# Altium PCB OmniCore_SDR.PcbDoc (part 4 of 14)
Units mil, origin at the board's own origin, x right, y up, seen from the top; angles counter-clockwise.
Board outline 4724.72 x 2755.91 mil, 8 copper layers (Top, GND 1, Layer 1, Layer 2, GND 2, Layer 3, Power, Bottom), stack 40.468 mil thick; 534 components, 427 nets, 2325 pads, 1892 vias.
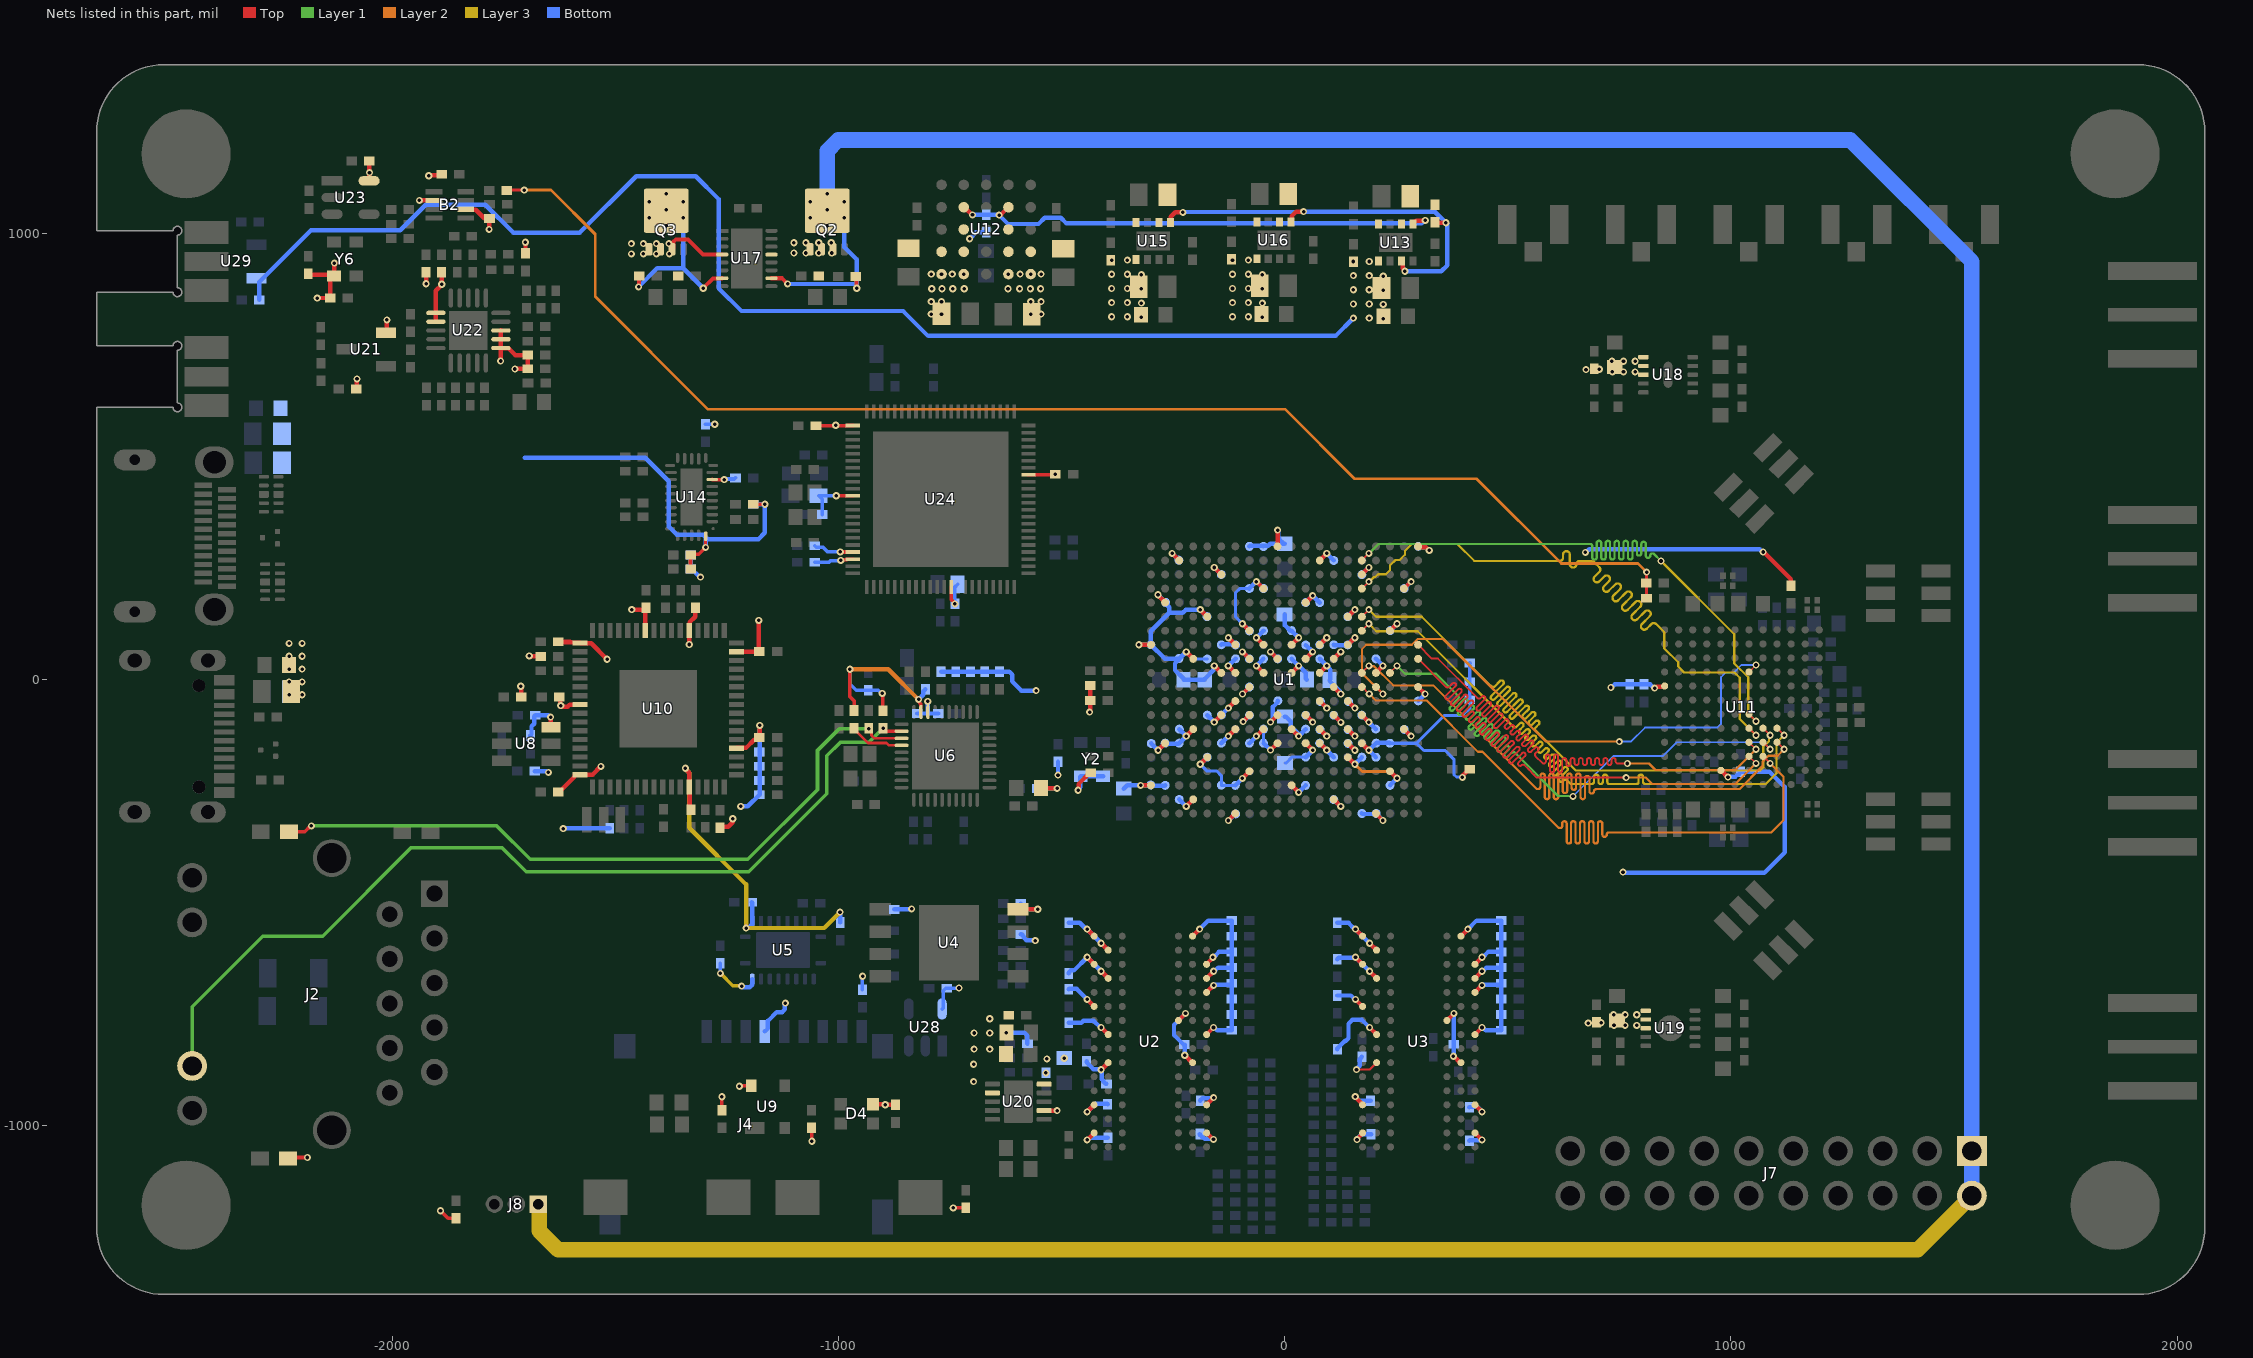
[diagram p9: the nets of this part, all layers, seen from the top]

## Via types
v1: diameter 16, hole 8, Top to Bottom, tented both sides, 1844 vias
v2: diameter 19.68, hole 7.87, Top to Bottom, 44 vias
v3: diameter 200, hole 125, Top to Bottom, 4 vias

## Nets (pads, with @x,y where several pads share a name; then routed paths per layer and width w, separated by ;. In a path a pad name is that pad's centre, name@x,y a point inside that pad or via, vN(x,y) a via of type N, cw(c..) or ccw(c..) an arc to the next point about the centre after c; other vN are vias at no path point)
1V0: C8.2 C9.2 C10.2 C11.2 C12.2 C13.2 C14.2 C15.2 C40.2 C41.2 C172.2 C173.2 C238.2 C241.1 C263.2 C264.2 C265.2 C266.2 C267.2 C268.2 C303.2 C307.2 U1.G7 U1.G11 U1.G13 U1.H10 U1.H12 U1.J7 U1.J13 U1.K12 U1.L7 U1.L13 U1.M12 U1.N7 U1.N13 U1.P8 U1.P12 U1.R7 U1.R13 U12.A1 U12.B1 U12.D1 U12.E1 | length 901.7
  Top w10: v1(-126.39,30.71) -126.31,30.71 -110.56,14.96 U1.G11@-110.48,14.96 ; v1(-126.23,-126.77) U1.G7@-110.48,-111.02 ; v1(-126.23,93.7) U1.G13@-110.48,77.95 ; v1(-94.73,62.2) U1.H12@-78.98,46.46 ; v1(-94.6,-32.28) -94.6,-32.22 -78.98,-16.6 U1.H10@-78.98,-16.54 ; v1(-63.24,-126.77) U1.J7@-47.49,-111.02 ; v1(-63.24,93.7) U1.J13@-47.49,77.95 ; v1(-31.74,62.2) U1.K12@-15.99,46.46 ; U1.L7@15.5,-111.02 v1(31.25,-126.77) ; U1.L13@15.5,77.95 v1(31.25,93.7) ; U1.M12@47,46.46 v1(62.75,62.2) ; U1.N7@78.5,-111.02 v1(94.24,-126.77) ; U1.N13@78.5,77.95 v1(94.24,93.7) ; U1.P8@109.99,-79.53 109.99,-79.66 126.1,-95.77 v1(126.1,-95.9) v1@126.23,-95.9 ; U1.P12@109.99,46.46 v1(125.74,62.2) ; U1.R7@141.36,-111.02 U1.R7@141.49,-111.02 v1(157.24,-126.77) ; U1.R13@141.49,77.95 v1(157.24,93.7)
  Bottom w10: C14.2@-142,77.9 -140.7,79.2 C173.2@-111.72,79.2 ; C41.2@-141.9,-142.4 v1(-126.23,-126.77) ; v1(-126.39,30.71) -126.14,30.71 -110.25,46.6 C266.2@-110,46.6 ; v1(-126.23,93.7) C173.2@-111.72,79.2 ; C173.2@-110.2,77.7 C173.2@-111.7,79.2 ; v1(-94.73,62.2) -94.73,62.07 -79.4,46.74 C40.2@-79.4,46.6 ; v1@-94.6,-32.24 C267.2@-79,-16.6 ; C268.2@-79,-142.5 v1@-63.25,-126.77 ; v1(-63.24,93.7) -63.12,93.7 -47.52,109.3 C9.2@-47.4,109.3 ; v1(-31.74,62.2) -31.57,62.2 -15.77,46.4 C8.2@-15.6,46.4 ; C303.2@-0.1,146.24 -0.1,121.3 0,121.2 1.19,121.2 12.77,109.63 15.4,109.63 31.25,93.77 v1(31.25,93.7) ; C307.2@0.4,-82.94 2.37,-82.94 13.12,-93.69 13.12,-104.58 30.1,-121.57 30.1,-125.62 v1(31.25,-126.77) ; v1@31.25,-126.71 47,-110.96 C263.2@47,-110.9 ; C11.2@47.3,77.4 47.43,77.4 62.62,62.2 v1(62.75,62.2) ; C10.2@78.5,77.9 v1(94.24,93.7) ; C264.2@79.1,-112 79.29,-112 94.06,-126.77 v1(94.24,-126.77) ; C13.2@110,78 111.3,76.7 140.3,76.7 C12.2@141.3,77.7 ; C15.2@110.15,-80 v1(126.1,-95.9) ; C12.2@141.3,77.7 v1(157.24,93.7) ; C265.2@142.1,-112 142.28,-112 157.05,-126.77 v1(157.24,-126.77)
  other v1: -792,819 -769,819 -569,819 -546,819 -792,847 -769,847 -569,847 -546,847 -791,876 -768,876 -744,876 -718,876 -620,876 -594,876 -570,876 -547,876 -792,908.69 -769,908.69 -745,908.69 -719,908.69 -619,908.69 -593,908.69 -569,908.69 -546,908.69
1V0_PG: R120.1 U12.B4 U12.D4 U13.1 | length 1123.7
  Top w10: U12.B4@-719,1058.69 -717.92,1058.69 -700.71,1041.47 v1(-699.63,1041.47) ; v1(-640,1041) -638.85,1042.15 -635.54,1042.15 U12.D4@-619,1058.69 ; U13.1@287.39,1020.71 287.39,1022.68 290.26,1025.55 292.23,1025.55 294.53,1027.85 314.01,1027.85 v1(315.16,1029)
  Bottom w10: v1(-699.63,1041.47) -699.58,1041.42 -669.05,1041.42 R120.1@-669,1041.37 -668.82,1041.19 -640.18,1041.19 v1(-640,1041) -620,1021 -551.69,1021 -537.69,1035 -502,1035 -490,1023 307.53,1023 313.53,1029 v1(315.16,1029)
1V8: C24.2 C25.2 C26.2 C27.2 C28.2 C29.2 C30.2 C31.2 C46.2 C47.2 C59.2 C60.2 C64.2 C65.2 C66.2 C67.2 C68.2 C69.2 C72.2 C73.2 C132.1 C136.2 C137.2 C138.2 C176.2 C180.2 C187.2 C189.2 C190.2 C191.2 C204.2 C205.2 C234.2 C248.2 C253.2 C254.2 C258.2 C259.2 C269.2 C270.2 C271.2 C272.2 C301.2 C306.2 C309.2 L1.2 L2.2 R5.1 R6.1 R64.1 R65.1 R66.1 R67.1 R69.2 R119.2 R122.2 R146.1 U1.A13 U1.B16 U1.D12 U1.E15 U1.F8 U1.F11 U1.G9 U1.H8 U1.J11 U1.K8 U1.L11 U1.M8 U1.N9 U1.N11 U1.N19 U1.P10 U1.R9 U1.R15 U1.T8 U1.T18 U1.U11 U1.V14 U1.W7 U1.W17 U1.Y10 U1.Y20 U5.2 U6.28 U10.12 U10.37 U10.49 U10.64 U11.B8 U11.H12 U13.4 U13.5 U18.1 U18.2 U18.3 U19.1 U19.2 U19.3 U29.3 | length 7610.5
  Top w4.2: v1(-800,-49) -799.7,-49.3 -799.7,-72.3 U6.28@-799.4,-72.6
  Top w10: C189.2@-1627.65,-252 -1625.69,-252 -1590.46,-216.78 -1590.46,-214.02 -1589.56,-213.11 U10.64@-1578.73,-213.11 -1551.11,-213.11 v1(-1532.4,-194.4) ; v1(-1518.6,45.6) -1554.26,81.26 -1577.83,81.26 U10.49@-1578.73,82.17 -1579.64,83.07 -1598.91,83.07 ; v1(-1343.1,-198.7) -1343.1,-200.32 -1334.64,-208.79 U10.12@-1334.64,-240.67 ; v1(-1334.38,78.56) -1334.38,109.47 U10.37@-1334.64,109.72 -1333.73,110.63 -1333.73,128.27 -1321,141 -1321,160.65 C191.2@-1320.34,161.31 ; U10.12@-1333.73,-242.48 -1333.73,-287.92 C190.2@-1330.34,-291.31 ; v1(-437,-73) -436.18,-72.18 -436.18,-47.81 R5.1@-435.37,-47 R6.1@-435.37,-13 ; v1(-326.63,77.98) U1.A13@-299.46,77.95 ; v1(-283.94,190) -283.94,189.21 -267.96,173.23 U1.B16@-267.96,172.44 ; v1(-220.72,62.2) U1.D12@-204.97,46.46 ; v1(-189.22,156.69) U1.E15@-173.47,140.94 ; v1(-157.72,-95.28) U1.F8@-141.98,-79.53 ; v1(-157.72,30.71) U1.F11@-141.98,14.96 ; v1(-126.23,-63.78) U1.G9@-110.48,-48.03 ; v1(-93.18,-94.28) -93.18,-94 -78.98,-79.81 U1.H8@-78.98,-79.53 ; v1(-63.24,30.71) U1.J11@-47.49,14.96 ; v1(-31.74,-95.28) U1.K8@-15.99,-79.53 ; U1.L11@15.5,14.96 v1(31.25,30.71) ; U1.M8@47,-79.53 v1(62.75,-95.28) ; U1.N9@78.5,-48.03 v1(94.24,-63.78) ; U1.N11@78.5,14.96 v1(94.24,30.71) ; U1.N19@78.5,266.93 v1(94.24,282.68) ; U1.P10@109.99,-16.54 v1(125.74,-32.28) ; U1.R9@141.49,-48.03 v1(157.24,-63.78) ; U1.R15@141.49,140.94 v1(157.24,156.69) ; U1.T8@172.98,-79.53 v1(188.73,-95.28) ; U1.T18@172.98,235.43 v1(188.73,251.18) ; U1.U11@204.48,14.96 v1(220.23,30.71) ; U1.V14@235.98,109.45 v1(251.72,125.2) ; U1.W7@267.47,-111.02 v1(283.22,-126.77) ; U1.W17@267.47,203.94 v1(283.22,219.68) ; U1.Y10@298.97,-16.54 v1(314.72,-32.28) ; U1.Y20@298.97,298.43 300.44,296.95 315.93,296.95 323.38,289.5 v1(324,289.5) ; v1(829,-19) 830.62,-19 833.91,-15.72 850.34,-15.72 U11.H12@851.51,-14.54 ; U11.B8@977.5,-203.52 977.98,-203.52 993.01,-218.54 v1(993.5,-218.54) ; v1(1072.25,285.86) 1073.5,285.86 1134.5,224.86 1134.5,210.19 R119.2@1134.4,210.09 ; -1598.91,83.07 -1600.84,85 C187.2@-1627.65,85 -1625.72,83.07 -1598.91,83.07
  Layer 3 w10: v1(-1343.1,-198.7) -1343.1,-200.32 -1334.4,-209.02 -1334.4,-331.74 -1207,-459.14 v1(-1207,-557) -1206.69,-556.69 -1031.98,-556.69 v1(-996.46,-521.17)
  Bottom w7: v1(-220.72,62.2) -204.72,46.21 C176.2@-173.42,46.21
  Bottom w8: R146.1@-2298.02,850.8 R146.1@-2297.81,850.59
  Bottom w10: R146.1@-2298.02,850.8 -2298.02,891.03 -2182.04,1007 -1981.96,1007 -1924.86,1064.1 -1791.4,1064.1 -1728.4,1001.1 -1580.2,1001.1 -1453.3,1128 -1319.6,1128 -1268.6,1077 -1268.6,877.3 -1217.3,826 -855.15,826 -799.25,770.1 114.1,770.1 v1(154,810) ; v1(-1207,-557) -1205.85,-555.85 -1201.35,-555.85 U5.2@-1193.39,-547.89 ; C132.1@-1194.53,-499.04 -1193.11,-500.46 U5.2@-1193.11,-547.61 ; v1(-996.46,-521.17) -996.34,-521.29 -996.34,-544.23 R69.2@-996.21,-544.35 ; C136.2@-823,-76 -799.5,-76 ; v1(-800,-49) -799.5,-49.5 -799.5,-76 ; C137.2@-776,-76 -799.5,-76 ; R64.1@-770,17.68 R65.1@-737,17.68 R66.1@-704,17.68 R67.1@-672,17.68 C138.2@-639,17.69 -616.86,17.69 -610.51,11.34 -610.51,-4.22 -590.13,-24.6 v1(-557.1,-24.6) ; v1(-326.63,77.98) C270.2@-299.9,78 ; v1(-283.94,190) C269.2@-266.9,173 -266.9,170.29 -259,162.39 -259,149.5 ; C271.2@-237.88,47.1 -269,47.1 C270.2@-299.9,78 ; C271.2@-236.41,45.63 -245.8,36.24 -245.8,20.93 -226.44,1.57 C309.2@-226.44,-0.4 -179.26,-0.4 L1.2@-179.16,-0.5 -179.16,1.47 -158.87,21.76 -158.87,29.56 v1(-157.72,30.71) ; C271.2@-236.41,46.51 v1(-220.72,62.2) ; C272.2@-174,141.1 -174,141.29 -189.22,156.51 v1(-189.22,156.69) -221.33,156.69 -228.52,149.5 -259,149.5 ; C47.2@-173.4,-79.6 v1(-157.72,-95.28) ; C180.2@-141.9,-79.6 -141.9,-79.53 -126.23,-63.85 v1(-126.23,-63.78) ; v1(-93.18,-94.28) -93.18,-94.18 -79,-80 C28.2@-79,-79.9 ; v1(-63.24,30.71) C25.2@-47.5,46.4 ; v1(-31.74,-95.28) -31.74,-93.65 -26.32,-88.23 -26.32,-61.22 -15.2,-50.11 C27.2@-15.2,-47.4 ; C24.2@15.4,46.4 15.48,46.4 31.17,30.71 v1(31.25,30.71) 32.29,30.71 47.4,15.6 47.4,2.16 L2.2@49.56,0 ; C46.2@47.1,-80 47.29,-80 62.56,-95.28 v1(62.75,-95.28) ; C26.2@78.6,46.4 v1(94.24,30.71) ; C30.2@79.9,-49 79.9,-49.22 94.24,-63.56 v1(94.24,-63.78) ; v1(94.24,30.71) 94.24,30.46 102.3,22.4 102.3,0.86 C306.2@100.44,-1 100.44,-2.97 124.59,-27.12 124.59,-31.14 v1(125.74,-32.28) ; v1(94.24,282.68) 94.33,282.68 110.01,267 C59.2@110.1,267 ; C72.2@141.4,140.9 v1(157.24,156.69) ; C31.2@142.9,-49 142.9,-49.22 157.24,-63.56 v1(157.24,-63.78) ; C29.2@172.7,-79.6 172.88,-79.6 188.55,-95.28 v1(188.73,-95.28) 188.73,-95.45 204,-110.72 C65.2@204,-110.9 ; C69.2@173,235.1 173,235.28 188.73,251.01 v1(188.73,251.18) ; C68.2@204.5,46.5 v1(220.23,30.71) ; C67.2@236.3,109.7 v1(251.72,125.2) ; C64.2@267.9,-111.6 267.97,-111.6 283.15,-126.77 v1(283.22,-126.77) ; C73.2@268,204.1 268,204.28 283.22,219.5 v1(283.22,219.68) ; C66.2@299.2,-47.8 v1(314.72,-32.28) ; C60.2@299.3,298.5 301.21,296.59 315.29,296.59 322.38,289.5 v1(324,289.5) ; v1(673.9,284.9) 675.45,284.9 682.76,292.21 1064.28,292.21 1070.62,285.86 v1(1072.25,285.86) ; v1(731,-17.7) 732.62,-17.7 739.47,-10.86 C205.2@773.5,-10.86 C301.2@805.5,-10.86 819.23,-10.86 827.38,-19 v1(829,-19) ; v1(758.16,-431.34) 759.82,-433 1075.2,-433 1120.75,-387.45 1120.75,-240.55 1086.43,-206.23 C204.2@1021.5,-206.23 1021.5,-208.2 1016.65,-213.04 1014.69,-213.04 1010.33,-217.4 994.64,-217.4 v1(993.5,-218.54) ; C270.2@-299.9,78 -299.91,108.59 -259,149.5
  other v1: 738,-775 763,-775 789,-775 680.3,-769.7 709,-769 737,-751 763,-751 789,-751 734.3,689.5 759.3,689.5 785.3,689.5 675.3,694.5 705.3,695.5 733.3,713.5 759.3,713.5 785.3,713.5 221,809 189.56,810 221,840.75 154,841.75 189.56,841.75 221,872.5 189.56,873.5 154,873.5 221,904.25 154,905.25 189.56,905.25 154,937 189.56,937
1V8_PG: R121.1 U13.7 U15.1 U16.1 | length 937.2
  Top w10: U15.1@-256.17,1024.02 -255,1025.2 -255,1037 -245,1047 v1(-228,1047) ; U16.1@14.39,1025.71 15.56,1026.88 15.56,1038.69 25.56,1048.69 v1(42.56,1048.69) ; U13.7@261.8,938.03 264.67,935.16 264.67,921.39 269.34,916.71 v1(269.34,915.09) ; R121.1@337,1024.69 337.46,1024.22 360.91,1024.22 v1(361.37,1023.76)
  Bottom w10: v1(-228,1047) -227.16,1047.84 41.72,1047.84 v1(42.56,1048.69) 336.45,1048.69 v1(361.37,1023.76) 364,1021.13 364,928.18 350.91,915.09 v1(269.34,915.09)
1V35: C16.2 C17.2 C18.2 C19.2 C20.2 C21.2 C22.2 C23.2 C44.2 C45.2 C76.2 C77.2 C78.2 C79.2 C80.2 C81.2 C82.2 C83.2 C84.2 C85.2 C86.2 C87.2 C88.2 C89.2 C90.2 C91.2 C92.2 C93.2 C94.2 C95.2 C96.2 C97.2 C98.2 C99.2 C100.2 C101.2 C102.2 C103.2 C104.2 C105.2 C106.2 C107.2 C108.2 C109.2 C110.2 C111.2 C123.2 C124.2 C167.1 C168.1 C174.2 C175.2 C293.2 C294.2 C305.2 R28.1 R30.2 R128.2 U1.A3 U1.D2 U1.E5 U1.G1 U1.H4 U1.L3 U1.P2 U1.R5 U1.U1 U1.V4 U2.A1 U2.A8 U2.B2 U2.C1 U2.C9 U2.D2 U2.D9 U2.E9 U2.F1 U2.G7 U2.H2 U2.H9 U2.K2 U2.K8 U2.N1 U2.N9 U2.R1 U2.R9 U3.A1 U3.A8 U3.B2 U3.C1 U3.C9 U3.D2 U3.D9 U3.E9 U3.F1 U3.G7 U3.H2 U3.H9 U3.K2 U3.K8 U3.N1 U3.N9 U3.R1 U3.R9 U16.4 U16.5 U20.2 | length 4002.9
  Top w5: v1(161,-874) 190.48,-874 U3.K2@206.02,-858.46
  Top w10: v1(-442.72,-1031.69) U2.R1@-426.98,-1015.94 ; v1(-442.72,-968.7) U2.N1@-426.98,-952.95 ; v1(-442.72,-716.73) U2.F1@-426.98,-732.48 ; v1(-442.72,-622.24) U2.C1@-426.98,-637.99 ; v1(-442.72,-559.25) U2.A1@-426.98,-575 ; v1(-411.23,-874.21) U2.K2@-395.48,-858.46 ; v1(-411.23,-779.72) U2.H2@-395.48,-795.47 ; v1(-411.23,-653.74) U2.D2@-395.48,-669.49 ; v1(-411.23,-590.75) U2.B2@-395.48,-606.49 ; v1(-323,-237) U1.A3@-299.46,-237.01 ; U2.G7@-238,-763.97 v1(-222.25,-748.23) ; v1(-224,-842) -223.48,-842 -207.02,-858.46 U2.K8@-206.5,-858.46 ; v1(-220.5,-284.25) -220.5,-284.14 -204.97,-268.61 U1.D2@-204.97,-268.5 ; U2.A8@-206.5,-575 v1(-190.76,-559.25) ; v1(-189.22,-189.76) U1.E5@-173.47,-174.02 ; U2.R9@-175.01,-1015.94 -174.53,-1015.94 -159.98,-1030.5 v1(-159.5,-1030.5) ; U2.N9@-175.01,-952.95 -175.01,-952.74 -159.41,-937.14 v1(-159.41,-936.93) ; U2.H9@-175.01,-795.47 -175.01,-795.35 -159.5,-779.84 v1(-159.5,-779.72) ; U2.E9@-175.01,-700.98 v1(-159.26,-685.23) ; U2.D9@-175.01,-669.49 v1(-159.26,-653.74) ; U2.C9@-175.01,-637.99 -175.01,-637.2 -160.85,-623.04 v1(-160.85,-622.24) ; v1(-126.23,-315.75) U1.G1@-110.48,-300 ; v1(-94.73,-221.5) -94.73,-221.38 -78.98,-205.63 U1.H4@-78.98,-205.51 ; U1.L3@15.5,-237.01 v1(31.25,-252.76) ; U1.P2@109.99,-268.5 v1(125.74,-284.25) ; U1.R5@141.49,-174.02 v1(157.24,-189.76) ; v1(158.1,-934.5) 158.1,-935.51 174.52,-951.94 U3.N1@174.52,-952.95 ; v1(158.77,-716.73) U3.F1@174.52,-732.48 ; v1(158.77,-622.24) U3.C1@174.52,-637.99 ; v1(158.77,-559.25) U3.A1@174.52,-575 ; v1(162,-1031) 162,-1029.73 174.52,-1017.21 U3.R1@174.52,-1015.94 ; v1(190.27,-779.72) U3.H2@206.02,-795.47 ; v1(190.27,-653.74) U3.D2@206.02,-669.49 ; v1(190.27,-590.75) U3.B2@206.02,-606.49 ; U1.U1@204.48,-300 v1(220.23,-315.75) ; U1.V4@235.98,-205.51 v1(251.72,-221.26) ; U3.G7@363.5,-763.97 v1(379.25,-748.23) ; v1(378,-844) 379.27,-844 393.73,-858.46 U3.K8@394.99,-858.46 ; U3.A8@394.99,-575 v1(410.74,-559.25) ; U3.R9@426.49,-1015.94 v1(442.24,-1031.69) ; U3.N9@426.49,-952.95 v1(442.24,-968.7) ; U3.H9@426.49,-795.47 v1(442.24,-779.72) ; U3.E9@426.49,-700.98 v1(442.24,-685.23) ; U3.D9@426.49,-669.49 v1(442.24,-653.74) ; U3.C9@426.49,-637.99 v1(442.24,-622.24)
  Layer 2 w7: v1(157.24,-189.76) 173.19,-205.71 236.18,-205.71 v1(251.72,-221.26)
  Bottom w7: v1(-189.22,-189.76) -173.72,-205.26 -151.8,-205.26 -141.9,-215.16 C23.2@-141.9,-236.8 -141.75,-236.95 -110.55,-236.95 R28.1@-110.4,-237.1
  Bottom w10: v1(-623.56,-791) -583.5,-791 -576.8,-797.7 -576.8,-815.51 R30.2@-576.31,-816 ; C87.2@-484,-769.31 -455.52,-769.31 -451.21,-765 -427.57,-765 -412.85,-779.72 v1(-411.23,-779.72) ; C88.2@-484,-694.31 -482.68,-693 -466.45,-693 v1(-442.72,-716.73) ; C85.2@-484,-658.69 -484,-656.72 -479.16,-651.87 -472.36,-651.87 v1(-442.72,-622.24) v1(-411.23,-653.74) ; C96.2@-484,-544.63 -458.97,-544.63 -444.35,-559.25 v1(-442.72,-559.25) v1(-411.23,-590.75) ; C123.2@-444,-855.69 -444,-857.65 -428.59,-873.06 -412.38,-873.06 v1(-411.23,-874.21) -410.08,-875.36 -410.08,-895.23 -406.13,-899.19 -406.13,-901.16 -401.28,-906 C92.2@-399.31,-906 ; v1(-442.72,-1031.69) -441.1,-1031.69 -435.73,-1026.31 C80.2@-396,-1026.31 ; v1(-442.72,-968.7) -425.03,-951 -397.31,-951 C86.2@-397,-951.31 ; C305.2@-360.6,-244.54 -353.06,-237 v1(-323,-237) -322.55,-236.55 -300.45,-236.55 C174.2@-300,-236.1 -298.09,-238.01 -291.01,-238.01 -290.75,-238.27 -268.97,-238.27 C44.2@-267.8,-237.1 ; C175.2@-236.4,-268.6 -236.28,-268.6 -220.62,-284.25 v1(-220.5,-284.25) ; v1(-224,-842) -224.34,-841.66 -224.34,-818.34 C82.2@-224.69,-818 -226.65,-818 -248,-796.65 -248,-773.97 v1(-222.25,-748.23) ; v1(-190.76,-559.25) -171.51,-540 C91.2@-118.69,-540 C90.2@-118.69,-575.14 C93.2@-118.69,-610.29 ; C81.2@-190,-1018.31 -190,-1020.28 -185.16,-1025.13 -183.19,-1025.13 -178.96,-1029.35 -160.65,-1029.35 v1(-159.5,-1030.5) ; v1(-189.22,-189.76) -189.22,-189.64 -173.6,-174.02 C17.2@-173.6,-173.9 ; C79.2@-189,-944.31 -189,-942.49 -184.16,-937.65 -184.16,-938.08 -160.56,-938.08 v1(-159.41,-936.93) ; v1(-160.85,-622.24) -159.22,-622.24 -147.27,-610.29 C93.2@-118.69,-610.29 ; v1(-159.5,-779.72) -157.88,-779.72 -151.6,-786 C83.2@-118.69,-786 C84.2@-118.69,-750.86 C89.2@-118.69,-715.71 C94.2@-118.69,-680.57 ; v1(-159.26,-685.23) -158.11,-684.09 -122.2,-684.09 C94.2@-118.69,-680.57 ; v1(-159.26,-653.74) -157.64,-653.74 -149.33,-645.43 C95.2@-118.69,-645.43 ; v1(-126.23,-315.75) -125.44,-315.75 -110.69,-301 C16.2@-109.9,-301 ; R28.1@-110.4,-237.1 v1@-94.77,-221.5 ; v1(31.25,-252.76) 31.25,-252.7 46.8,-237.15 C18.2@46.8,-237.1 ; C22.2@110.1,-269 110.29,-269 125.55,-284.25 v1(125.74,-284.25) ; C102.2@118,-707.98 148.4,-707.98 157.15,-716.73 v1(158.77,-716.73) ; C104.2@118,-626.65 121.26,-623.39 157.63,-623.39 v1(158.77,-622.24) v1(190.27,-653.74) ; C101.2@118,-545.32 143.22,-545.32 157.15,-559.25 v1(158.77,-559.25) v1(190.27,-590.75) ; C103.2@118.09,-828.69 118.09,-826.72 134.09,-810.72 135.93,-810.72 143,-803.65 143,-771.45 151.73,-762.72 173.27,-762.72 v1(190.27,-779.72) ; v1@157.24,-189.71 C20.2@173.1,-173.85 ; v1(158.1,-934.5) 167.91,-944.31 C76.2@192.5,-944.31 ; v1(161,-874) 161,-872.38 168.16,-865.22 168.16,-850.53 C124.2@173,-845.69 ; v1(162,-1031) 163.15,-1029.85 163.15,-1027.32 171.15,-1019.31 C77.2@193.5,-1019.31 ; C45.2@173.1,-300 174.35,-301.25 206.04,-301.25 220.23,-315.44 v1(220.23,-315.75) ; C19.2@236.1,-237 236.1,-236.94 v1(251.72,-221.26) v1(251.72,-221.26) ; v1(378,-844) 378.66,-843.34 378.66,-748.81 v1(379.25,-748.23) ; v1(410.74,-559.25) 429.99,-540 C106.2@485.31,-540 C105.2@485.31,-575.14 C108.2@485.31,-610.29 ; C111.2@414,-1033.31 414.81,-1032.5 441.43,-1032.5 v1(442.24,-1031.69) ; C110.2@414,-958.31 414.49,-957.82 432.98,-957.82 442.24,-967.07 v1(442.24,-968.7) ; v1(442.24,-779.72) 443.86,-779.72 450.14,-786 C107.2@485.31,-786 C97.2@485.31,-750.86 C98.2@485.31,-715.71 C99.2@485.31,-680.57 ; v1(442.24,-685.23) 443.39,-684.09 481.8,-684.09 C99.2@485.31,-680.57 ; v1(442.24,-653.74) 443.86,-653.74 452.17,-645.43 C100.2@485.31,-645.43 ; v1(442.24,-622.24) 443.86,-622.24 455.82,-610.29 C108.2@485.31,-610.29 ; C94.2@-118.69,-680.57 C95.2@-118.69,-645.43 ; C95.2@-118.69,-645.43 C93.2@-118.69,-610.29 ; C99.2@485.31,-680.57 C100.2@485.31,-645.43 ; C100.2@485.31,-645.43 C108.2@485.31,-610.29
  other v1: -697,-901 -697,-862 -696,-828 -661,-828 -696,-792 -661,-792 -661,-760 -50,812 -117,813 -81.44,813 -50,843.75 -117,844.75 -81.44,844.75 -117,876.5 -81.44,876.5 -50,875.5 -50,907.25 -117,908.25 -81.44,908.25 -117,940 -81.44,940
3V3: B2.2 B2.6 C1.1 C2.2 C5.1 C32.2 C33.2 C34.2 C35.2 C42.2 C43.2 C48.2 C49.2 C50.2 C51.2 C52.2 C53.2 C54.2 C55.2 C56.2 C57.2 C70.2 C71.2 C112.1 C113.1 C126.1 C129.1 C130.1 C133.1 C143.2 C144.2 C145.2 C154.2 C155.2 C163.2 C170.2 C179.2 C181.2 C182.2 C183.2 C184.2 C185.2 C188.2 C192.2 C193.2 C194.2 C195.2 C198.2 C247.2 C262.1 C273.1 C281.2 C282.2 C283.2 C284.2 C287.1 C288.1 C289.1 C292.2 C295.2 C304.2 C308.2 D4.4 J4.4 L4.1 R1.1 R4.1 R9.2 R13.1 R14.1 R18.2 R19.2 R21.2 R22.2 R29.2 R63.2 R72.1 R74.1 R77.1 R78.1 R81.2 R89.1 R90.2 R95.2 R96.2 R97.2 R98.2 R101.1 R102.2 R103.2 R104.2 R107.2 R108.1 R113.2 R127.2 U1.B6 U1.C19 U1.D7 U1.F18 U1.H14 U1.J17 U1.K6 U1.K20 U1.M6 U1.M16 U1.N6 U1.R6 U1.T6 U4.8 U5.19 U6.29 U8.6 U9.4 U10.20 U10.31 U10.42 U10.56 U14.8 U15.4 U15.5 U20.7 U20.10 U21.3 U22.6 U22.7 U22.16 U22.17 U22.18 U23.5 U24.1 U24.11 U24.19 U24.20 U24.35 U24.59 U28.5 Y2.1 Y2.4 Y6.4 | length 5434.2
  Top w8: v1(-1891.84,-1190.4) -1874.85,-1207.38 R14.1@-1856.9,-1207.38 ; U14.8@-1282.72,448.37 -1282.53,448.18 -1256.18,448.18 v1(-1256,448) ; v1(-1261.3,-935) -1261.2,-935.1 -1261.2,-964.91 C113.1@-1261.1,-965.01 ; v1(-1221.87,-911.45) -1220.88,-910.46 U9.4@-1195.5,-910.46 ; R4.1@-1060.1,-1004.39 -1059.75,-1004.74 -1059.75,-1034.25 v1(-1059.4,-1034.6) ; C163.2@-1050.31,569 -980,569 -979.6,569.4 U24.1@-967.9,569.4 ; v1(-1005,412) v1(-1005,412) -967.95,411.95 U24.11@-967.9,411.9 ; v1(-996,286) v1(-996,286) -967.95,285.95 U24.19@-967.9,285.9 ; v1(-995,267) -993.47,268.53 -981.17,268.53 -979.6,270.1 U24.20@-967.9,270.1 ; v1(-974.5,23.2) -974.5,-38.1 -965,-47.6 R72.1@-965,-69.32 ; v1(-901.79,-30.81) -900.89,-31.71 -900.89,-68.74 R89.1@-900,-69.63 ; v1(-820.47,-44.47) -818.94,-46 -818.94,-51.23 -815.16,-55 U6.29@-815.16,-60.85 ; U24.35@-747.4,207.2 -747.4,179.45 -739,171.05 v1(-739,169.69) ; v1(-742.82,-1183.84) -742.67,-1183.68 R13.1@-714.7,-1183.68 ; U24.59@-574.2,459.1 -574.15,459.15 -514.54,459.15 v1(-513.68,460) ; L4.1@-546.44,-243 L4.1@-545.44,-244
  Top w10: R74.1@-2233.5,-1073 -2231.5,-1071 v1(-2190,-1071) ; C262.1@-2188.35,909.35 -2185.95,906.95 -2132.75,906.95 Y6.4@-2130.35,904.55 ; v1(-2168,855) -2167.83,855.17 -2139.52,855.17 C273.1@-2139.35,855.35 -2139.35,897.15 -2131.95,904.55 Y6.4@-2130.35,904.55 ; v1(-2129.73,933.4) -2130.35,932.78 Y6.4@-2130.35,904.55 ; R108.1@-2080.66,651.35 -2079.83,652.18 -2079.83,673.17 v1(-2079,674) ; U23.5@-2051.99,1117.75 -2051.99,1135.01 v1(-2051,1136) -2051.33,1136.33 -2051.33,1162.02 C289.1@-2051.66,1162.35 ; U21.3@-2013.84,777.34 -2012,779.18 v1(-2012,806) ; v1(-1939,1074) -1938.86,1073.86 -1906.35,1073.86 B2.2@-1906.21,1073.72 ; C283.2@-1924.35,912.66 -1924.17,912.49 -1924.17,887.17 v1(-1924,887) ; v1(-1918,1129) -1916.85,1130.15 -1891.23,1130.15 C288.1@-1889.03,1132.35 ; U22.7@-1902.18,802.03 U22.6@-1902.18,821.72 -1902.18,871.2 -1889,884.38 v1(-1889,886) -1889.17,886.17 -1889.17,912.49 C284.2@-1889.35,912.66 ; B2.6@-1835.35,1054.03 -1834.44,1053.13 -1813.13,1053.13 -1794,1034 -1782.68,1034 C287.1@-1782.03,1033.35 -1782.52,1032.86 -1782.52,1009.48 v1(-1783,1009) ; v1(-1757,714) -1757,742.9 -1756.92,742.98 U22.16@-1756.51,742.98 ; U22.18@-1756.51,782.35 U22.17@-1756.51,762.66 U22.16@-1756.51,742.98 ; v1(-1725,696) -1724.83,696.17 -1696.2,696.17 C282.2@-1696.03,696.35 C281.2@-1696.03,727.35 -1724.31,727.35 -1739.94,742.98 U22.16@-1756.51,742.98 ; v1(-1712,-15) -1711.33,-15.67 -1711.33,-38.33 C179.2@-1710.65,-39 ; v1(-1701.58,980.18) -1701.35,979.95 R101.1@-1701.35,955.03 ; v1(-1693,53) -1692.5,52.5 -1667.52,52.5 R90.2@-1667.02,52 ; v1(-1645,-84) -1645,-105.82 U8.6@-1644.22,-106.6 ; C195.2@-1625.65,-39 -1623.61,-41.05 -1623.61,-57.31 v1(-1622.46,-58.46) ; v1@-1623.38,-61 -1621.98,-59.61 -1619.69,-59.61 -1618.29,-61 -1607,-61 -1602.11,-56.11 -1579.21,-56.11 U10.56@-1578.73,-55.63 ; v1(-1463.3,156.9) C193.2@-1433.06,156.9 ; U10.42@-1433.06,109.72 -1433.06,159.59 C193.2@-1431.34,161.31 ; R107.2@-1265.34,-331.69 -1263.65,-330 -1247,-330 -1237,-320 v1(-1237,-312) ; U10.20@-1228.34,-154.06 -1227.43,-153.15 -1207.15,-153.15 -1188.84,-134.84 -1183.83,-134.84 -1176.51,-127.52 -1176.76,-127.27 -1176.76,-102.96 v1(-1176.5,-102.7) ; U10.31@-1228.34,62.48 -1228.08,62.74 C194.2@-1177.28,62.74 ; v1(-1178.7,132.7) -1178.7,64.16 C194.2@-1177.28,62.74 ; C194.2@-1177.02,63 C194.2@-1177.28,62.74 ; D4.4@-922.78,-951.45 -922.1,-952.12 -895.88,-952.12 v1(-895.2,-952.8) -894.99,-953.01 -872.31,-953.01 C112.1@-872.1,-953.22 ; U4.8@-597.7,-515 -553.69,-515 v1(-553.44,-514.74) ; L4.1@-545.44,-244 v1(-510,-244) ; U20.7@-538.93,-965.68 -538.77,-965.84 -510.16,-965.84 v1(-510,-966) ; v1(-463,-248) -461.85,-246.85 -461.85,-234.2 -436.65,-209 R9.2@-434.69,-209 R9.2@-433.84,-209.84 ; v1(-283.71,-158.27) U1.B6@-267.96,-142.52 ; v1(-252.21,282.68) U1.C19@-236.46,266.93 ; v1(-220.72,-126.77) U1.D7@-204.97,-111.02 ; v1(-157.72,251.18) U1.F18@-141.98,235.43 ; v1(-94.73,125.2) U1.H14@-78.98,109.45 ; v1(-63.5,219.68) -63.37,219.68 -47.62,203.94 U1.J17@-47.49,203.94 ; v1(-31.74,-158) -31.61,-158 -16.13,-142.52 U1.K6@-15.99,-142.52 ; U1.K20@-15.99,298.43 v1(-16,335) ; U1.M6@47,-142.52 47.13,-142.52 62.61,-158 v1(62.75,-158) ; U1.M16@47,172.44 v1(62.75,188.19) ; U1.N6@78.5,-142.52 78.61,-142.52 94.09,-158 v1(94.21,-158) ; U1.R6@141.49,-142.52 v1(157.24,-158.27) ; U1.T6@172.98,-142.52 v1(188.73,-158.27) ; v1(398.4,-219.1) 399.55,-217.95 399.55,-214.17 412.72,-201 R22.2@414.69,-201
  Layer 2 w10: v1(-974.5,23.2) -888.14,23.2 v1(-820.47,-44.47)
  Layer 3 w8: v1(-1264.5,-658.4) -1237,-685.9 -1218.1,-685.9 v1(-1217,-687)
  Bottom w7: v1(-94.73,125.2) -110.23,140.7 -110.23,194.61 -100.94,203.9 C56.2@-79.1,203.9 ; C49.2@-47.5,-142.4 -47.45,-111.15 C33.2@-47.4,-111.1 ; C308.2@0.9,-187.14 2.87,-187.14 16.21,-173.8 C35.2@47,-173.8 ; C181.2@235.9,-142.6 295.48,-142.6 ; v1(398.4,-219.1) 397.7,-218.4 385,-218.4 379.15,-212.55 379.15,-178.25 359.9,-159 311.88,-159 295.48,-142.6 ; R19.2@414.69,37 C5.1@414.69,-5 R21.2@414.69,-45 415.5,-45.82 415.5,-63.6 398.52,-80.58 357.5,-80.58 295.48,-142.6
  Bottom w8: R78.1@-1331.32,248 R78.1@-1329.35,248 ; R1.1@-1298,572.37 -1277.41,572.37 v1(-1277.32,572.29) ; C133.1@-1265.1,-635.7 -1264.8,-636 -1264.8,-658.1 v1(-1264.5,-658.4) ; v1(-1256,448) -1254.47,449.53 -1233.15,449.53 C1.1@-1230.68,452 ; C198.2@-1053.31,263 -1021.16,263 -1018.16,266 -996,266 v1(-995,267) ; C188.2@-1053.31,300 -1049.52,296.2 -1034.49,296.2 -1024.28,286 v1(-996,286) ; C170.2@-1036.31,370 -1036.31,403.81 C185.2@-1044.5,412 v1(-1005,412) ; v1(-974.5,23.2) -974.5,-9 -959.81,-23.69 C145.2@-933,-23.69 -911.08,-23.69 -903.95,-30.81 v1(-901.79,-30.81) ; R81.2@-946.2,-695.41 -946.2,-665.09 v1(-945.91,-664.8) ; U28.5@-767.7,-738.18 -765.5,-735.99 -765.5,-697.34 -759.66,-691.5 C295.2@-757.71,-691.5 -757.51,-691.3 -730,-691.3 v1(-729.8,-691.1) ; v1(-739,169.69) -739,207.5 C155.2@-733,213.5
  Bottom w10: R104.2@-1690.34,-125.31 -1687.89,-122.87 -1687.89,-104.89 -1681.98,-98.98 -1681.98,-82.33 R102.2@-1679.65,-80 -1650.62,-80 -1646.62,-84 v1(-1645,-84) ; R103.2@-1680.65,-205 -1654.62,-205 -1651.62,-208 v1(-1650,-208) ; v1(-1616.8,-333.9) -1616.19,-333.29 -1512.95,-333.29 R113.2@-1512.34,-332.69 ; R78.1@-1331.32,249.97 R77.1@-1331.32,279 ; R78.1@-1329.35,248 -1312.19,230.85 -1310.35,230.85 v1(-1309.2,229.7) ; v1(-1218.83,-284.18) -1203.21,-284.18 R95.2@-1177.02,-258 -1176.76,-257.74 -1176.76,-102.96 v1(-1176.5,-102.7) ; v1(-1217,-687) -1214,-690 -1199.24,-690 -1193.39,-684.14 -1193.39,-671.28 U5.19@-1193.11,-671 ; J4.4@-1164.75,-788.56 -1157.94,-781.75 -1157.94,-764.94 -1138.02,-745.02 -1126.01,-745.02 -1120.15,-739.17 -1120.15,-726.15 v1(-1119,-725) ; R63.2@-875,-515 -874.5,-514.5 -836.5,-514.5 v1(-836,-514) ; v1(-820.47,-44.47) -809.84,-33.84 -809.84,-26.53 C143.2@-805,-21.69 ; R18.2@-591.31,-571 -589.35,-571 -584.5,-575.84 -584.5,-577.99 -578.65,-583.85 -560.15,-583.85 v1(-559,-585) ; C129.1@-591.32,-502 -591,-502.31 -591,-508.89 -585.14,-514.74 v1(-553.44,-514.74) ; C144.2@-554.31,-244 v1(-510,-244) ; v1@-507.97,-213.97 C2.2@-508,-184.37 ; v1(-463,-248) -463,-246.38 -458,-241.38 -458,-217.6 Y2.1@-457,-216.6 Y2.4@-407,-216.6 ; C57.2@-299,-143.1 -298.94,-143.1 -283.77,-158.27 v1(-283.71,-158.27) -283.71,-158.19 -268,-142.48 C42.2@-268,-142.4 -266.63,-143.77 -237.77,-143.77 C182.2@-236.5,-142.5 ; v1(-252.21,282.68) -252.14,282.68 -237.07,267.6 C54.2@-237,267.6 ; C182.2@-236.5,-142.5 v1(-220.72,-126.77) ; C70.2@-236.1,-111 -236.1,-111.19 -220.72,-126.58 v1(-220.72,-126.77) ; v1(-157.72,251.18) v1(-157.72,251.18) -142.07,235.6 C52.2@-142,235.6 ; v1(-94.73,125.2) -94.73,125.01 -79,109.28 C55.2@-79,109.1 ; C56.2@-79.1,203.9 -79.1,203.99 -63.5,219.59 v1(-63.5,219.68) -63.34,219.68 -47.66,204 C71.2@-47.5,204 ; C184.2@-78.9,298.5 -77.72,299.68 -48.98,299.68 C183.2@-47.6,298.3 -45.69,300.21 -36.86,300.21 -32.62,304.46 C304.2@-1.87,304.46 ; C49.2@-47.42,-142.4 -31.82,-158 v1(-31.74,-158) ; v1(-16,335) -14.85,333.85 -14.85,319.41 -12.62,317.18 -12.62,315.21 C304.2@-1.87,304.46 ; C304.2@0.1,304.46 C304.2@-1.87,304.46 ; C35.2@47,-173.8 v1(62.75,-158) ; C53.2@47,172.6 47.08,172.6 v1(62.75,188.19) v1(62.75,188.19) ; v1@62.78,188.19 C48.2@78.5,172.5 ; C32.2@78.4,-142.5 78.55,-142.5 94.05,-158 v1(94.21,-158) 94.21,-158.15 110,-173.95 C51.2@110,-174.1 ; C34.2@141.9,-143 v1(157.24,-158.27) ; C50.2@204.6,-174.1 188.75,-158.27 188.83,-158.27 204.7,-142.4 C43.2@204.8,-142.4 205.93,-141.27 234.57,-141.27 C181.2@235.9,-142.6
  other v1: -535,-881.31 -533,-850 -494,-848.44 -507.93,-214 -1006,570 -321,812 -388,813 -352.44,813 -321,843.75 -388,844.75 -352.44,844.75 -388,876.5 -352.44,876.5 -321,875.5 -321,907.25 -388,908.25 -352.44,908.25 -388,940 -352.44,940
5V: C232.2 C236.2 C237.2 C244.2 C245.2 J7.1 J7.2 J8.1 Q2.5-6-7-8 Q3.5-6-7-8 R120.2 R121.2 R131.1 R134.1 U12.A2 U12.B2 U12.B3 U12.D2 U12.D3 U12.E2 U13.2 U15.2 U16.2 U17.7 U17.10 | length 9094.9
  Top w9: v1(-1448,880) -1447.08,880.92 -1447.08,903.35 R134.1@-1446.16,904.27 ; v1(-1303,877) -1280.72,899.28 -1260.6,899.28 U17.7@-1260.48,899.4 ; U17.10@-1150,899.4 -1126.4,899.4 v1(-1113.91,886.89) ; R131.1@-960.79,903.27 -959.89,902.37 -959.89,877.89 v1(-959,877)
  Layer 3 w35: J8.1@-1672.5,-1175.4 -1670.32,-1177.59 -1670.32,-1235.48 -1627.8,-1278 1418.5,-1278 J7.2@1540,-1156.5
  Bottom w9: v1(-1113.91,886.89) -959.89,886.89 -959,886 v1(-959,877)
  Bottom w10: v1(-1448,880) -1406.52,921.48 -1347.48,921.48 ; v2(-1347.48,1034.94) -1347.48,921.48 ; v1(-1303,877) -1347.48,921.48 ; v2(-986.7,1034.94) -986.7,969.32 -959,941.62 -959,886 ; v1(-706,988) -692,1002 R120.2@-669,1002
  Bottom w35: v2(-1025.09,1017.14) v2(-1025.09,1052.77) v2(-1025.09,1088.4) -1025.09,1184.81 -1000.7,1209.2 1267.5,1209.2 1540,936.7 J7.1@1540,-1056.5 J7.2@1540,-1156.5
  other v2: -1385.86,1017.14 -1424.25,1034.94 -1063.48,1034.94 -1385.86,1052.77 -1424.25,1070.57 -1347.48,1070.57 -1063.48,1070.57 -986.7,1070.57 -1385.86,1088.4
5V_USB2: C171.1 C178.1 C252.2 L5.1 Q2.1 Q2.2 Q2.3 U17.13
  other v1: -2231,-34 -2202,-34 -2231,-5.23 -2202,-5.23 -2231,23.55 -2202,23.55 -2231,52.32 -2202,52.32 -2231,81.09 -2202,81.09 -1100,956 -1073,956 -1044,956 -1015,956 -1100,979 -1073,979 -1044,979 -1016,979
5V_USB3: C3.1 C261.2 C296.1 C302.1 L3.2 Q3.1 Q3.2 Q3.3 R12.2 R79.2 R80.1 U14.30 U17.4 | length 1058.9
  Top w7: R79.2@-1331.31,279 -1329.42,280.9 -1313.1,280.9 v1(-1297.61,296.39) -1297.61,321.25 U14.30@-1297.5,321.36 ; R12.2@-1191.31,393 v1(-1165,393)
  Top w9: Q3.3@-1373.07,964.27 -1369.69,967.64 -1369.69,981.28 -1364.42,986.55 -1337.55,986.55 -1303.55,952.55 U17.4@-1260.48,952.55 ; C3.1@-1331.32,248 R79.2@-1331.31,279
  Bottom w10: -1702.5,497.3 -1432.7,497.3 -1380.2,444.8 -1380.2,343 -1362,324.8 -1303.36,324.8 -1301.89,323.34 -1297.5,318.94 ; v1(-1297.61,296.39) -1297.5,296.5 -1297.5,318.94 ; R80.1@-1191.32,393 v1(-1165,393) -1165,328.8 -1179.2,314.6 -1293.16,314.6 -1297.5,318.94
  other v1: -1464,954 -1437,954 -1408,954 -1379,954 -1464,977 -1437,977 -1408,977 -1380,977
ACTLED0: J2.13 R89.2 U6.32 | length 2078.5
  Top w8: v1(-900,-109) -893.1,-115.9 U6.32@-858.4,-115.9
  Layer 1 w8: J2.13@-2448.46,-865.83 -2448.45,-733.45 -2290,-575 -2156,-575 -1958,-377 -1754,-377 -1700,-431 -1201,-431 -1026,-256 -1026,-171 -995,-140 -931,-140 v1(-900,-109)
ACTLED1: R73.2 R75.1 U6.33 | length 1597.6
  Top w6: v1(-932,-110.65) -925.82,-116.84 -925.82,-124.88 -919.1,-131.6 U6.33@-858.4,-131.6
  Top w8: R75.1@-2231.5,-341 -2196.16,-341 -2183.16,-328 v1(-2181,-328) ; v1(-932,-110.65) R73.2@-932,-108.69
  Layer 1 w8: v1(-2181,-328) -1766,-328 -1691,-403 -1203,-403 -1047,-247 -1047,-159 -998.65,-110.65 v1(-932,-110.65)
ACTLED2: R72.2 U6.34 | length 123.8
  Top w6: R72.2@-965,-108.69 -965,-110.65 -933.49,-142.16 -892.24,-142.16 -887,-147.4 U6.34@-858.4,-147.4
AD9361_CLK_IN: C199.2 R88.2 R140.1 | length 3050.1
  Top w4.2: R140.1@-1743.66,1096.35 R140.1@-1743.01,1097 ; R88.2@810.81,215.46 R88.2@811,215.65
  Top w6: R140.1@-1743.01,1097 v1(-1704,1097) ; C199.2@810.81,182.46 R88.2@810.81,215.46 ; R88.2@811,215.65 v1(811,241)
  Layer 2 w6: v1(-1704,1097) -1644,1097 -1545,998 -1545,858 -1293,606 0.7,606 156.6,450.1 430,450.1 619.9,260.2 791.8,260.2 v1(811,241)
AD9361_CLK_OUT: U1.U10 U11.J6 | length 1285
  Top w4.2: U1.U10@204.48,-16.54 v1(220.23,-32.28) ; U11.J6@1040.49,16.95 v1(1056.24,32.7)
  Layer 2 w5: v1(220.23,-32.28) 173,14.94 173,68 183,78 285,78 298,91 355,91 585,-139 v1(750,-139)
  Bottom w4.2: v1(750,-139) 776.06,-139 807.68,-107.38 969.72,-107.38 977.8,-99.3 977.8,5.7 987.4,15.3 1006.2,15.3 1023.6,32.7 v1(1056.24,32.7)
AD9361_CTRL_IN0: U1.T10 U11.C5 | length 1662
  Top w4: U1.T10@172.98,-16.54 U1.T10@173.46,-16.54 ; v1@188.92,-32 v1(189.4,-32)
  Top w4.2: U1.T10@173.46,-16.54 v1@188.92,-32 ; U11.C5@1071.98,-172.02 v1(1087.73,-187.77)
  Layer 2 w5: v1(189.4,-32) 204.18,-46.78 318.23,-46.78 432.94,-161.5 443.5,-161.5 609.4,-327.4 613.36,-331.36 ccw(c616.9,-327.83) 621.9,-327.83 621.9,-322.4 cw(c626.9,-322.4) 631.9,-322.4 631.9,-362.4 ccw(c636.9,-362.4) 641.9,-362.4 641.9,-322.4 cw(c646.9,-322.4) 651.9,-322.4 651.9,-362.4 ccw(c656.9,-362.4) 661.9,-362.4 661.9,-322.4 cw(c666.9,-322.4) 671.9,-322.4 671.9,-362.4 ccw(c676.9,-362.4) 681.9,-362.4 681.9,-322.4 cw(c686.9,-322.4) 691.9,-322.4 691.9,-362.4 ccw(c696.9,-362.4) 701.9,-362.4 701.9,-322.67 cw(c706.9,-322.67) 711.9,-322.67 711.9,-347.4 ccw(c716.9,-347.4) 721.9,-347.4 cw(c726.9,-347.4) 726.9,-342.4 857.65,-342.4 1090.9,-342.4 1117.99,-315.31 1117.99,-218.03 v1(1087.73,-187.77)
AD9361_CTRL_IN1: U1.Y12 U11.C6 | length 1661.9
  Top w4.2: U1.Y12@298.97,46.46 360.31,-14.89 361.8,-16.37 ccw(c365.05,-13.12) 368.3,-16.37 375.94,-8.74 cw(c379.19,-11.99) 382.45,-8.74 cw(c379.19,-11.99) 382.45,-15.24 361.07,-36.62 ccw(c364.32,-39.87) 361.07,-43.13 ccw(c364.32,-39.87) 367.57,-43.13 388.95,-21.75 cw(c392.2,-25) 395.46,-21.75 cw(c392.2,-25) 395.46,-28.25 373.68,-50.03 ccw(c376.93,-53.28) 373.68,-56.54 ccw(c376.93,-53.28) 380.18,-56.54 401.96,-34.76 cw(c405.21,-38.01) 408.47,-34.76 cw(c405.21,-38.01) 408.47,-41.26 386.69,-63.04 ccw(c389.94,-66.29) 386.69,-69.55 ccw(c389.94,-66.29) 393.19,-69.55 414.97,-47.77 cw(c418.23,-51.02) 421.48,-47.77 cw(c418.23,-51.02) 421.48,-54.27 399.9,-75.85 ccw(c403.15,-79.11) 399.9,-82.36 ccw(c403.15,-79.11) 406.4,-82.36 416.49,-72.27 cw(c419.74,-75.53) 422.99,-72.27 cw(c419.74,-75.53) 422.99,-78.78 413.84,-87.93 ccw(c417.09,-91.19) 413.84,-94.44 ccw(c417.09,-91.19) 420.34,-94.44 429.5,-85.28 cw(c432.75,-88.54) 436,-85.28 cw(c432.75,-88.54) 436,-91.79 428.63,-99.16 ccw(c431.89,-102.41) 428.63,-105.67 ccw(c431.89,-102.41) 435.14,-105.67 442.51,-98.3 cw(c445.76,-101.55) 449.01,-98.3 cw(c445.76,-101.55) 449.01,-104.8 438.73,-115.08 ccw(c441.98,-118.34) 438.73,-121.59 ccw(c441.98,-118.34) 445.24,-121.59 455.52,-111.31 cw(c458.77,-114.56) 462.03,-111.31 cw(c458.77,-114.56) 462.03,-117.81 451.74,-128.1 ccw(c454.99,-131.35) 451.74,-134.6 ccw(c454.99,-131.35) 458.25,-134.6 472.57,-120.28 cw(c475.82,-123.53) 479.07,-120.28 cw(c475.82,-123.53) 479.07,-126.78 464.75,-141.11 ccw(c468.01,-144.36) 464.75,-147.61 ccw(c468.01,-144.36) 471.26,-147.61 492.99,-125.88 cw(c496.24,-129.13) 499.49,-125.88 cw(c496.24,-129.13) 499.49,-132.39 477.76,-154.12 ccw(c481.02,-157.37) 477.76,-160.62 ccw(c481.02,-157.37) 484.27,-160.62 506,-138.89 cw(c509.25,-142.14) 512.5,-138.89 cw(c509.25,-142.14) 512.5,-145.4 490.77,-167.13 ccw(c494.03,-170.38) 490.77,-173.63 ccw(c494.03,-170.38) 497.28,-173.63 519.01,-151.9 cw(c522.26,-155.16) 525.52,-151.9 cw(c522.26,-155.16) 525.52,-158.41 503.78,-180.14 ccw(c507.04,-183.39) 503.78,-186.64 ccw(c507.04,-183.39) 510.29,-186.64 532.02,-164.91 cw(c535.27,-168.17) 538.53,-164.91 cw(c535.27,-168.17) 538.53,-171.42 524.4,-185.54 ccw(c527.66,-188.79) 524.4,-192.05 ccw(c527.66,-188.79) 530.91,-192.05 ; 530.94,-192.02 cw(c534.19,-195.27) 537.44,-192.02 546.76,-201.34 558.41,-212.99 565.13,-219.7 636.7,-219.7 v1(765,-219.7) ; U11.C6@1040.49,-172.02 v1(1056.24,-187.77)
  Layer 2 w5: v1(765,-219.7) 809.7,-219.7 824,-234 1010.01,-234 v1(1056.24,-187.77)
AD9361_CTRL_IN2: U1.Y13 U11.D6 | length 1661.9
  Top w4.2: U1.Y13@298.97,77.95 329.92,47 343.6,47 430.45,-39.85 431.94,-41.34 ccw(c435.19,-38.08) 438.44,-41.34 441.8,-37.98 cw(c445.05,-41.23) 448.3,-37.98 cw(c445.05,-41.23) 448.3,-44.48 430.8,-61.98 ccw(c434.06,-65.24) 430.8,-68.49 ccw(c434.06,-65.24) 437.31,-68.49 454.81,-50.99 cw(c458.06,-54.24) 461.31,-50.99 cw(c458.06,-54.24) 461.31,-57.5 443.81,-74.99 ccw(c447.07,-78.25) 443.81,-81.5 ccw(c447.07,-78.25) 450.32,-81.5 472.1,-59.72 cw(c475.35,-62.97) 478.6,-59.72 cw(c475.35,-62.97) 478.6,-66.23 456.83,-88 ccw(c460.08,-91.26) 456.83,-94.51 ccw(c460.08,-91.26) 463.33,-94.51 480.83,-77.01 cw(c484.08,-80.27) 487.33,-77.01 cw(c484.08,-80.27) 487.33,-83.52 469.84,-101.02 ccw(c473.09,-104.27) 469.84,-107.52 ccw(c473.09,-104.27) 476.34,-107.52 493.84,-90.02 cw(c497.09,-93.27) 500.35,-90.02 cw(c497.09,-93.27) 500.35,-96.53 494.29,-102.58 ccw(c497.55,-105.83) 494.29,-109.08 ccw(c497.55,-105.83) 500.8,-109.08 506.85,-103.03 cw(c510.1,-106.29) 513.36,-103.03 cw(c510.1,-106.29) 513.36,-109.54 507.3,-115.59 ccw(c510.56,-118.84) 507.3,-122.1 ccw(c510.56,-118.84) 513.81,-122.1 519.86,-116.05 cw(c523.11,-119.3) 526.37,-116.05 cw(c523.11,-119.3) 526.37,-122.55 520.31,-128.6 ccw(c523.57,-131.85) 520.32,-135.11 ccw(c523.57,-131.85) 526.82,-135.11 537.15,-124.77 cw(c540.41,-128.03) 543.66,-124.77 cw(c540.41,-128.03) 543.66,-131.28 533.33,-141.61 ccw(c536.58,-144.86) 533.33,-148.12 ccw(c536.58,-144.86) 539.83,-148.12 550.16,-137.78 cw(c553.42,-141.04) 556.67,-137.78 cw(c553.42,-141.04) 556.67,-144.29 546.34,-154.62 ccw(c549.59,-157.87) 546.34,-161.13 ccw(c549.59,-157.88) 552.84,-161.13 561.17,-152.8 cw(c564.42,-156.05) 567.68,-152.8 cw(c564.42,-156.05) 567.68,-159.3 562.04,-164.94 ccw(c565.3,-168.19) 562.04,-171.44 578.6,-188 580.7,-188 ccw(c580.7,-183.4) 585.3,-183.4 585.3,-172.6 cw(c589.9,-172.6) 594.5,-172.6 594.5,-203.4 ccw(c599.1,-203.4) 603.7,-203.4 603.7,-172.6 cw(c608.3,-172.6) 612.9,-172.6 612.9,-203.4 ccw(c617.5,-203.4) 622.1,-203.4 622.1,-180.39 cw(c626.7,-180.39) 631.3,-180.39 631.3,-189.19 ccw(c635.9,-189.19) 640.5,-189.19 640.5,-180.41 cw(c645.1,-180.41) 649.7,-180.41 649.7,-186.9 ccw(c654.3,-186.9) 658.9,-186.9 658.9,-180.41 cw(c663.5,-180.41) 668.1,-180.41 668.1,-186.9 ccw(c672.7,-186.9) 677.3,-186.9 677.3,-180.41 cw(c681.9,-180.41) 686.5,-180.41 686.5,-186.9 ccw(c691.1,-186.9) 695.7,-186.9 695.7,-180.41 cw(c700.3,-180.41) 704.9,-180.41 704.9,-186.9 ccw(c709.5,-186.9) 714.1,-186.9 714.1,-180.41 cw(c718.7,-180.41) 723.3,-180.41 723.3,-186.9 ccw(c727.9,-186.9) 732.5,-186.9 732.5,-180.41 cw(c737.1,-180.41) 741.7,-180.41 741.7,-183.4 ccw(c746.3,-183.4) 746.3,-188 v1(768,-188) ; U11.D6@1040.49,-140.53 v1(1056.24,-156.28)
  Layer 2 w5: v1(768,-188) 816.59,-188 831.09,-202.5 1010.01,-202.5 v1(1056.24,-156.28)
AD9361_CTRL_IN3: U1.V11 U11.D5 | length 1608.8
  Top w4.2: U1.V11@235.98,14.96 v1(251.72,30.71) ; U11.D5@1071.98,-140.53 v1(1087.73,-156.28)
  Layer 1 w5: v1(251.72,30.71) 269.43,13 339,13 379.8,-27.8 381.57,-29.57 388.64,-36.64 cw(c385.1,-40.17) 388.64,-43.71 370.96,-61.39 ccw(c374.5,-64.92) 370.96,-68.46 ccw(c374.5,-64.92) 378.03,-68.46 401.83,-44.66 cw(c405.36,-48.2) 408.9,-44.66 cw(c405.36,-48.2) 408.9,-51.73 389.54,-71.09 ccw(c393.08,-74.63) 389.54,-78.16 ccw(c393.08,-74.63) 396.61,-78.16 415.97,-58.81 cw(c419.51,-62.34) 423.04,-58.81 cw(c419.51,-62.34) 423.04,-65.88 407.05,-81.87 ccw(c410.58,-85.41) 407.05,-88.94 ccw(c410.58,-85.41) 414.12,-88.94 430.11,-72.95 cw(c433.65,-76.48) 437.18,-72.95 cw(c433.65,-76.48) 437.18,-80.02 413.39,-103.81 ccw(c416.92,-107.35) 413.39,-110.89 ccw(c416.92,-107.35) 420.46,-110.89 444.25,-87.09 cw(c447.79,-90.63) 451.33,-87.09 cw(c447.79,-90.63) 451.33,-94.16 427.53,-117.96 ccw(c431.07,-121.49) 427.53,-125.03 ccw(c431.07,-121.49) 434.6,-125.03 458.4,-101.23 cw(c461.93,-104.77) 465.47,-101.23 cw(c461.93,-104.77) 465.47,-108.3 448.96,-124.81 ccw(c452.49,-128.35) 448.96,-131.88 ccw(c452.49,-128.35) 456.03,-131.88 472.54,-115.37 cw(c476.07,-118.91) 479.61,-115.37 cw(c476.07,-118.91) 479.61,-122.45 463.1,-138.95 ccw(c466.64,-142.49) 463.1,-146.02 ccw(c466.64,-142.49) 470.17,-146.02 486.68,-129.52 cw(c490.22,-133.05) 493.75,-129.52 cw(c490.22,-133.05) 493.75,-136.59 477.24,-153.1 ccw(c480.78,-156.63) 477.24,-160.17 ccw(c480.78,-156.63) 484.31,-160.17 494.75,-149.74 cw(c498.28,-153.27) 501.82,-149.74 cw(c498.28,-153.27) 501.82,-156.81 493.72,-164.91 ccw(c497.25,-168.44) 493.72,-171.98 ccw(c497.25,-168.44) 500.79,-171.98 508.85,-163.92 cw(c512.38,-167.45) 515.92,-163.92 528.34,-176.34 530.11,-178.11 612.65,-260.65 644.95,-260.65 v1(646.1,-261.8)
  Bottom w4.2: v1(646.1,-261.8) 736.4,-171.5 847.7,-171.5 878.7,-140.5 1071.96,-140.5 v1(1087.73,-156.28)
AD9361_CTRL_OUT0: U1.T11 U11.D4 | length 1661.9
  Top w4.2: U1.T11@172.98,14.96 v1(188.73,30.71) ; U11.D4@1103.48,-140.53 v1(1119.23,-156.28)
  Layer 2 w5: v1(188.73,30.71) 189.44,30 200,30 243,-13 333,-13 565.5,-245.5 568,-245.5 ccw(c568,-240.5) 573,-240.5 573,-215.5 cw(c578,-215.5) 583,-215.5 583,-263 ccw(c588,-263) 593,-263 593,-215.5 cw(c598,-215.5) 603,-215.5 603,-263 ccw(c608,-263) 613,-263 613,-215.5 cw(c618,-215.5) 623,-215.5 623,-249.39 ccw(c628,-249.39) 633,-249.39 633,-215.5 cw(c638,-215.5) 643,-215.5 643,-242.3 ccw(c648,-242.3) 653,-242.3 653,-215.5 cw(c658,-215.5) 663,-215.5 663,-263 ccw(c668,-263) 673,-263 673,-220.83 cw(c678,-220.83) 683,-220.83 683,-250.5 ccw(c688,-250.5) 693,-250.5 cw(c698,-250.5) 698,-245.5 732.6,-245.5 1019.01,-245.5 1070.74,-193.78 1070.74,-184.26 1084.22,-170.78 1104.73,-170.78 v1(1119.23,-156.28)
AD9361_CTRL_OUT1: U1.T14 U11.E4 | length 1625.5
  Top w4.2: U1.T14@172.98,109.45 v1(188.73,125.2) ; U11.E4@1103.48,-109.03 v1(1119.23,-124.78)
  Layer 3 w5: v1(188.73,125.2) 205.43,108.5 298.1,108.5 510.55,-103.95 512.32,-105.72 ccw(c515.85,-102.18) 519.39,-105.72 526.75,-98.35 cw(c530.29,-101.89) 533.83,-98.35 cw(c530.29,-101.89) 533.83,-105.42 526.46,-112.79 ccw(c530,-116.32) 526.46,-119.86 ccw(c530,-116.32) 533.53,-119.86 540.9,-112.5 cw(c544.43,-116.03) 547.97,-112.5 cw(c544.43,-116.03) 547.97,-119.57 540.6,-126.93 ccw(c544.14,-130.47) 540.6,-134 ccw(c544.14,-130.47) 547.67,-134 555.04,-126.64 cw(c558.57,-130.17) 562.11,-126.64 cw(c558.57,-130.17) 562.11,-133.71 554.74,-141.07 ccw(c558.28,-144.61) 554.74,-148.14 ccw(c558.28,-144.61) 561.82,-148.14 569.18,-140.78 cw(c572.72,-144.31) 576.25,-140.78 cw(c572.72,-144.31) 576.25,-147.85 568.89,-155.22 ccw(c572.42,-158.75) 568.89,-162.29 ccw(c572.42,-158.75) 575.96,-162.29 583.32,-154.92 cw(c586.86,-158.46) 590.39,-154.92 cw(c586.86,-158.46) 590.39,-161.99 583.03,-169.36 ccw(c586.56,-172.89) 583.03,-176.43 ccw(c586.56,-172.89) 590.1,-176.43 597.46,-169.06 cw(c601,-172.6) 604.54,-169.06 cw(c601,-172.6) 604.54,-176.13 593.72,-186.95 ccw(c597.26,-190.48) 593.72,-194.02 ccw(c597.26,-190.48) 600.79,-194.02 611.61,-183.21 cw(c615.14,-186.74) 618.68,-183.21 cw(c615.14,-186.74) 618.68,-190.28 602.26,-206.69 ccw(c605.8,-210.23) 602.26,-213.76 ccw(c605.8,-210.23) 609.33,-213.76 625.75,-197.35 cw(c629.28,-200.88) 632.82,-197.35 cw(c629.28,-200.88) 632.82,-204.42 616.31,-220.93 ccw(c619.84,-224.47) 616.31,-228 ccw(c619.84,-224.47) 623.38,-228 625.46,-225.93 cw(c628.99,-229.46) 632.53,-225.93 640.8,-234.2 669.2,-234.2 685.6,-234.2 688.1,-234.2 ccw(c688.1,-229.2) 693.1,-229.2 693.1,-218 cw(c698.1,-218) 703.1,-218 703.1,-229.2 ccw(c708.1,-229.2) 713.1,-229.2 713.1,-218 cw(c718.1,-218) 723.1,-218 723.1,-229.2 ccw(c728.1,-229.2) 728.1,-234.2 788.1,-234.2 ccw(c788.1,-229.2) 793.1,-229.2 793.1,-218 cw(c798.1,-218) 803.1,-218 803.1,-229.2 ccw(c808.1,-229.2) 808.1,-234.2 819.35,-234.2 1078,-234.2 1102.23,-209.97 1102.23,-141.78 v1(1119.23,-124.78)
AD9361_CTRL_OUT2: U1.T15 U11.E5 | length 1625.5
  Top w4.2: U1.T15@172.98,140.94 v1(188.73,156.69) ; U11.E5@1071.98,-109.03 v1(1087.73,-124.78)
  Layer 3 w5: v1(188.73,156.69) 204.43,141 307.2,141 461.75,-13.55 463.52,-15.32 ccw(c467.05,-11.78) 470.59,-15.32 482.55,-3.35 cw(c486.09,-6.89) 489.63,-3.35 cw(c486.09,-6.89) 489.63,-10.42 463.22,-36.83 ccw(c466.76,-40.36) 463.22,-43.9 ccw(c466.76,-40.36) 470.3,-43.9 496.7,-17.5 cw(c500.23,-21.03) 503.77,-17.5 cw(c500.23,-21.03) 503.77,-24.57 477.37,-50.97 ccw(c480.9,-54.5) 477.37,-58.04 ccw(c480.9,-54.5) 484.44,-58.04 510.84,-31.64 cw(c514.37,-35.17) 517.91,-31.64 cw(c514.37,-35.17) 517.91,-38.71 491.51,-65.11 ccw(c495.04,-68.64) 491.51,-72.18 ccw(c495.04,-68.64) 498.58,-72.18 524.98,-45.78 cw(c528.52,-49.31) 532.05,-45.78 cw(c528.52,-49.31) 532.05,-52.85 505.65,-79.25 ccw(c509.19,-82.79) 505.65,-86.32 ccw(c509.19,-82.79) 512.72,-86.32 539.12,-59.92 cw(c542.66,-63.46) 546.19,-59.92 cw(c542.66,-63.46) 546.19,-66.99 534.16,-79.03 ccw(c537.69,-82.57) 534.16,-86.1 ccw(c537.69,-82.57) 541.23,-86.1 553.26,-74.06 cw(c556.8,-77.6) 560.34,-74.06 cw(c556.8,-77.6) 560.34,-81.13 548.3,-93.17 ccw(c551.83,-96.71) 548.3,-100.24 ccw(c551.83,-96.71) 555.37,-100.24 562.3,-93.31 cw(c565.84,-96.85) 569.37,-93.31 cw(c565.84,-96.85) 569.37,-100.38 562.51,-107.24 ccw(c566.05,-110.78) 562.51,-114.31 650.43,-202.23 652.2,-204 1066,-204 1072.73,-197.27 1072.73,-150.77 1085.63,-137.87 1085.63,-126.88 v1(1087.73,-124.78)
AD9361_CTRL_OUT3: U1.T17 U11.E6 | length 1625.5
  Top w4.2: U1.T17@172.98,203.94 v1(188.73,219.68) ; U11.E6@1040.49,-109.03 v1(1056.24,-124.78)
  Layer 3 w5: v1(188.73,219.68) 190.02,219.68 200.34,230 203,230 209,236 227,236 236,245 236,255.96 248.21,268.18 257.73,268.18 269.36,279.81 269.36,288.37 285,304 387,304 425,266 613.98,266 616.48,266 ccw(c616.48,273.5) 623.98,273.5 623.98,280.43 cw(c631.48,280.43) 638.98,280.43 638.98,258.5 ccw(c646.48,258.5) 653.98,258.5 cw(c661.48,258.5) 661.48,266 684.7,266 691,266 692.75,264.25 694.52,262.48 705.12,251.88 cw(c699.82,246.57) 705.12,241.27 694.52,230.66 ccw(c699.82,225.36) 694.52,220.06 ccw(c699.82,225.36) 705.12,220.06 716.12,231.05 cw(c721.43,225.75) 726.73,231.05 cw(c721.43,225.75) 726.73,220.45 715.73,209.45 ccw(c721.03,204.15) 715.73,198.84 ccw(c721.03,204.15) 726.34,198.84 740.7,213.2 cw(c746,207.9) 751.31,213.21 cw(c746,207.9) 751.31,202.6 736.94,188.24 ccw(c742.25,182.93) 736.94,177.63 ccw(c742.25,182.93) 747.55,177.63 765.15,195.23 cw(c770.45,189.92) 775.75,195.23 cw(c770.45,189.92) 775.75,184.62 758.16,167.02 ccw(c763.46,161.72) 758.16,156.42 ccw(c763.46,161.72) 768.76,156.42 786.36,174.01 cw(c791.66,168.71) 796.97,174.01 cw(c791.66,168.71) 796.97,163.41 779.37,145.81 ccw(c784.67,140.51) 779.37,135.2 ccw(c784.67,140.51) 789.98,135.2 807.57,152.8 cw(c812.88,147.5) 818.18,152.8 cw(c812.88,147.5) 818.18,142.19 800.58,124.6 ccw(c805.89,119.29) 800.58,113.99 ccw(c805.89,119.29) 811.19,113.99 821.8,124.6 cw(c827.1,119.29) 832.4,124.6 845.38,111.62 847.15,109.85 850.73,106.27 850.73,69.73 881.76,38.71 881.76,29.19 894.95,16 1008,16 1020,4 1020,-88.54 v1(1056.24,-124.78)
AD9361_CTRL_OUT4: U1.T19 U11.F6 | length 1625.5
  Top w4.2: U1.T19@172.98,266.93 v1(188.73,282.68) ; U11.F6@1040.49,-77.54 v1(1056.24,-93.28)
  Layer 1 w5: v1(188.73,282.68) 210.06,304 671.8,304 684.3,304 cw(c684.3,299) 689.3,299 689.3,274 ccw(c694.3,274) 699.3,274 699.3,306 cw(c704.3,306) 709.3,306 709.3,274 ccw(c714.3,274) 719.3,274 719.3,306 cw(c724.3,306) 729.3,306 729.3,274 ccw(c734.3,274) 739.3,274 739.3,306 cw(c744.3,306) 749.3,306 749.3,274 ccw(c754.3,274) 759.3,274 759.3,306 cw(c764.3,306) 769.3,306 769.3,274 ccw(c774.3,274) 779.3,274 779.3,306 cw(c784.3,306) 789.3,306 789.3,282.84 ccw(c794.3,282.84) 799.3,282.84 799.3,304 cw(c804.3,304) 809.3,304 809.3,277.83 ccw(c814.3,277.83) 819.3,277.83 cw(c824.3,277.83) 827.84,281.36 842.6,266.6 v1(843.4,265.8)
  Layer 3 w5: v1(843.4,265.8) 1007.74,101.46 1007.74,36.16 1038.8,5.1 1038.8,-75.85 v1(1056.24,-93.28)